# Altium PCB SemiPuente.PcbDoc
Units mm, origin at the board's own origin, x right, y up, seen from the top; angles counter-clockwise.
Board outline 100 x 99.9 mm, 2 copper layers (Top Layer, Bottom Layer); 18 components, 7 nets, 35 pads, 0 vias.
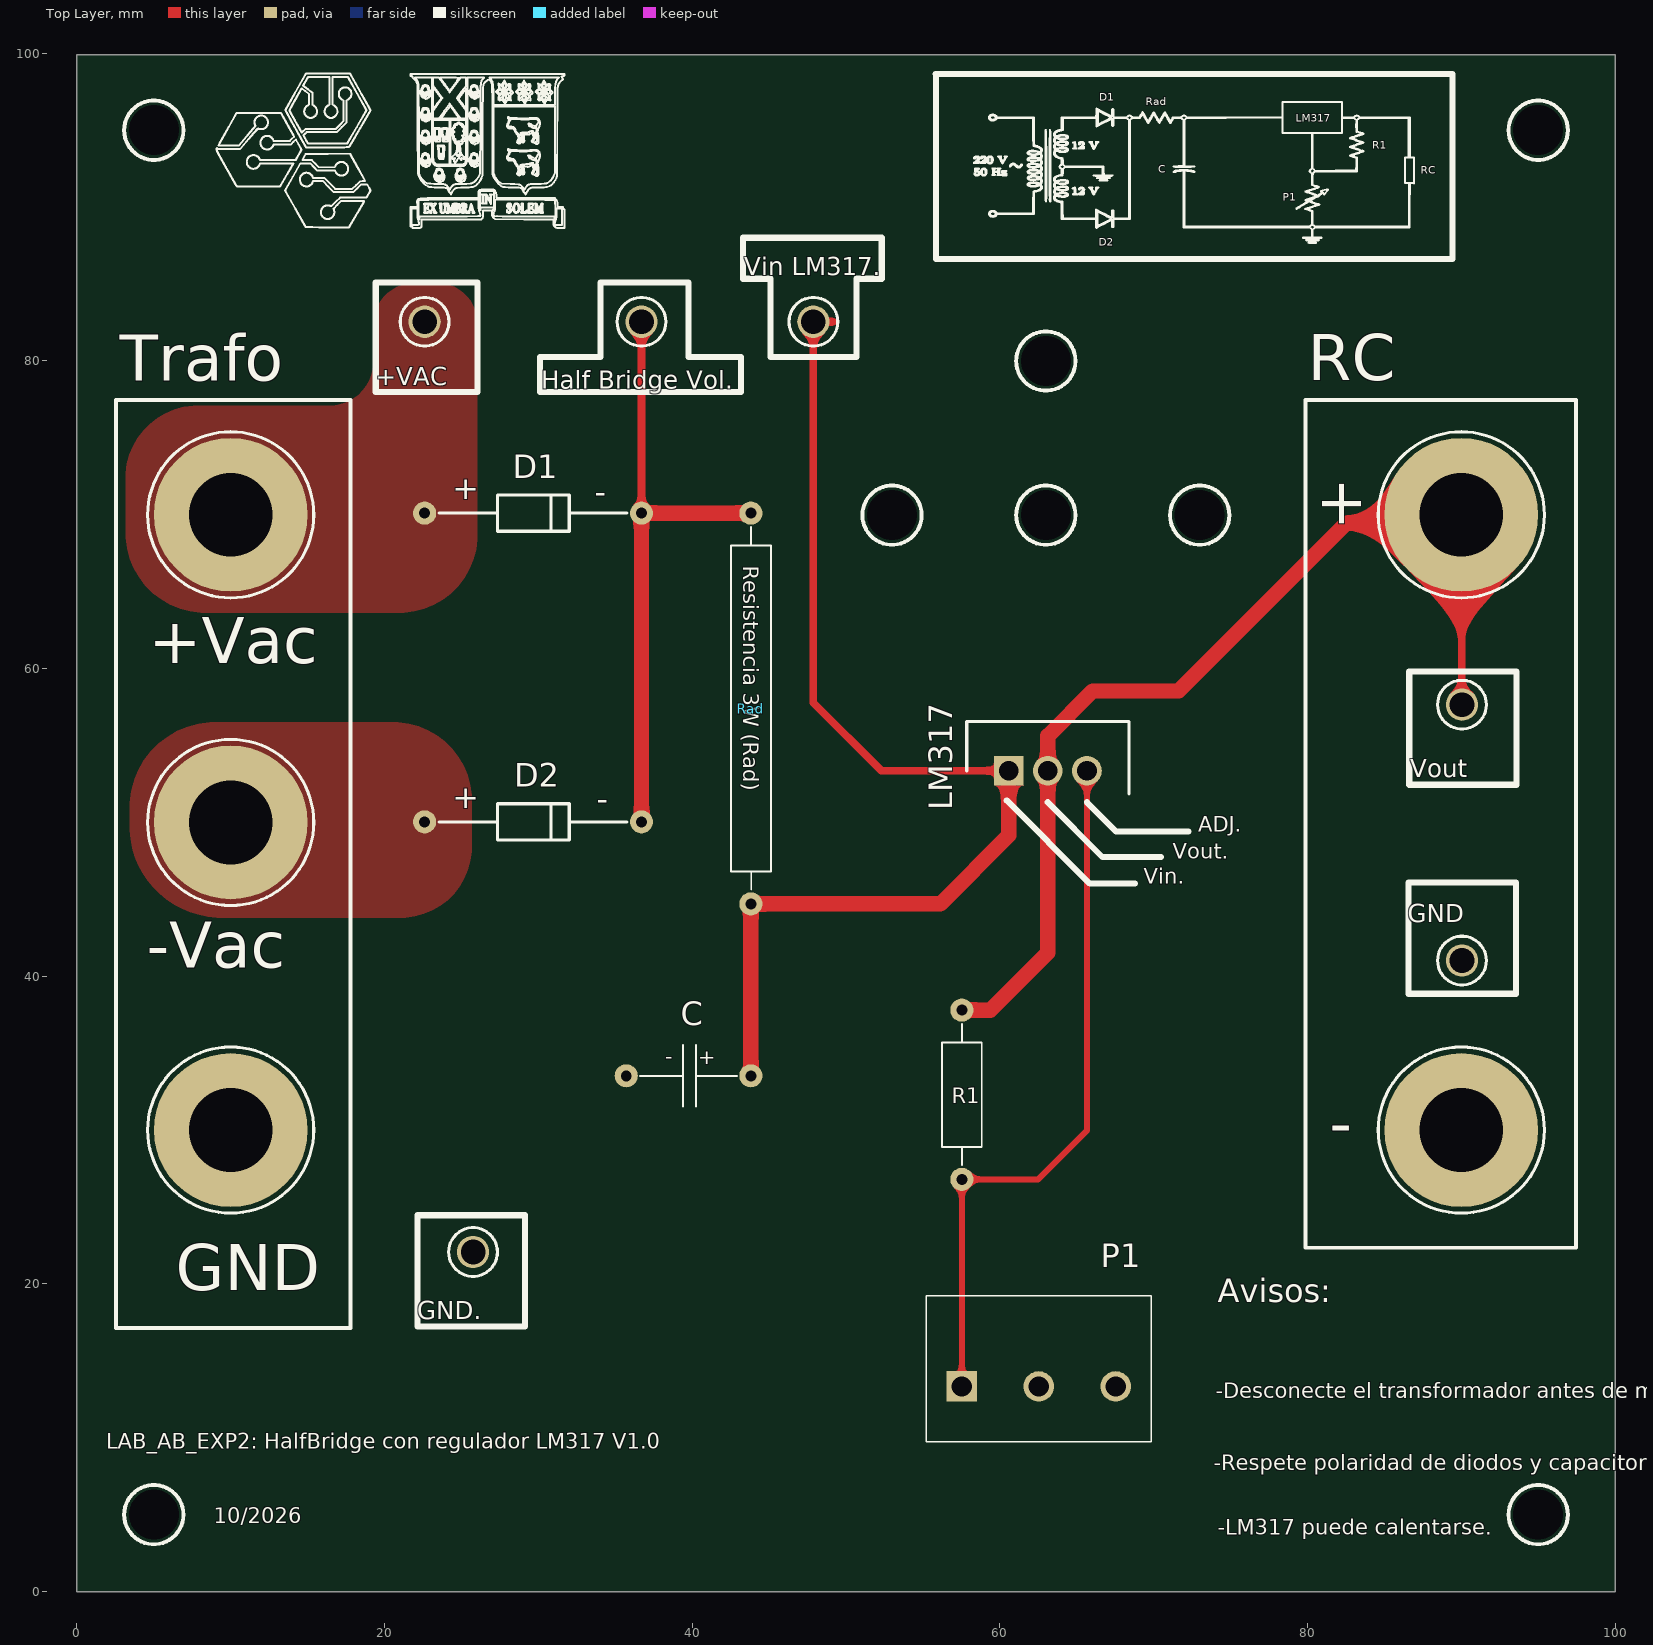
[diagram p0: Top Layer view]
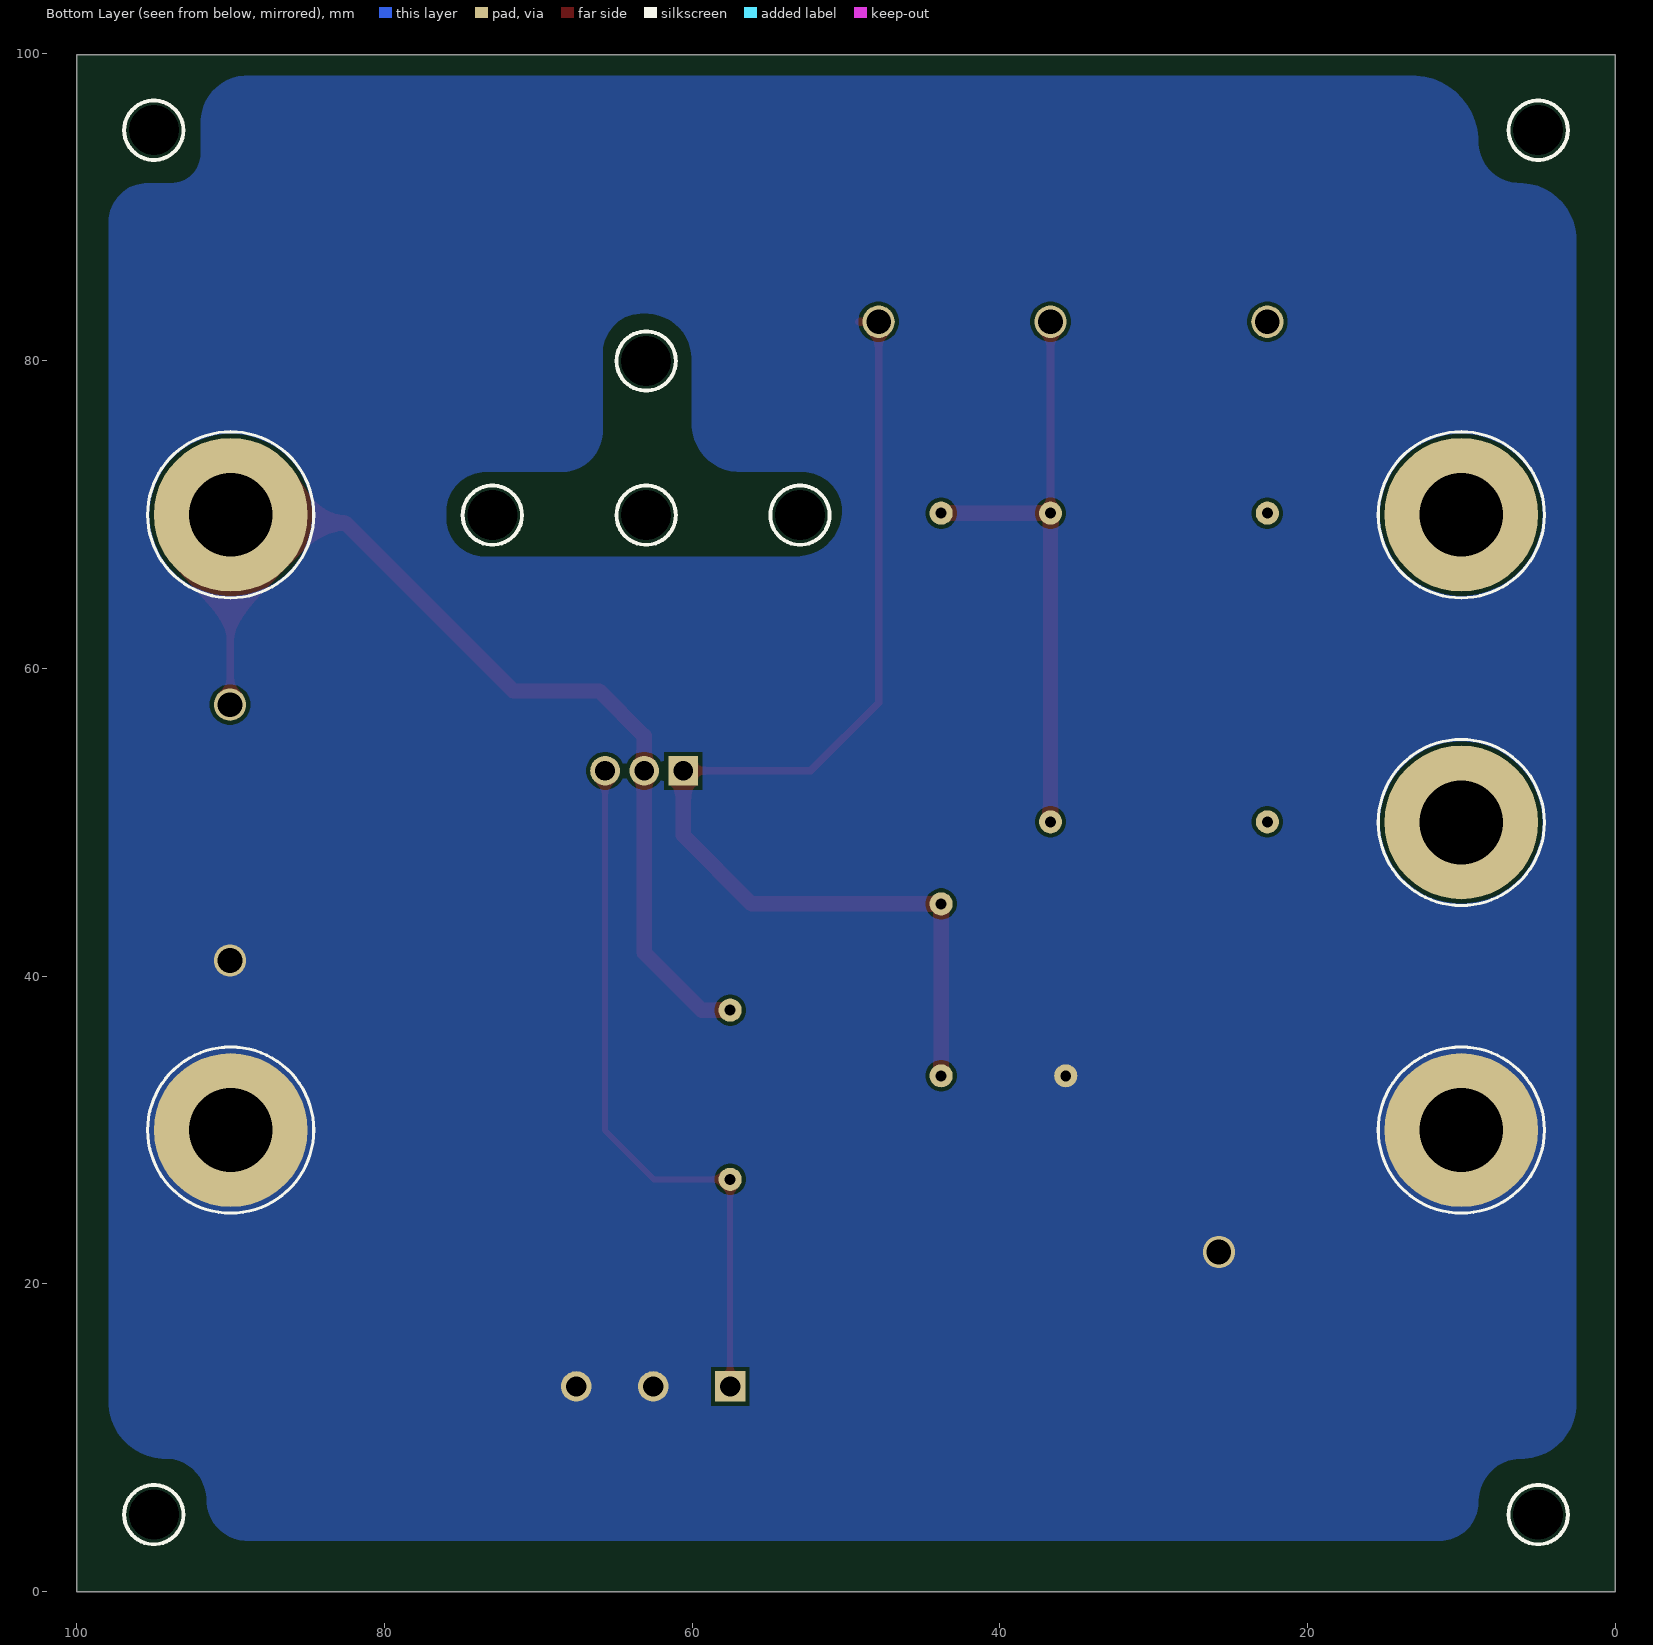
[diagram p1: Bottom Layer view, seen from below]

## Layer stack, top to bottom
Top Solder: solder mask 0.0102, Solder Resist, Dk 3.5
Top Layer: signal copper 0.0356
Dielectric 1: dielectric 0.32, FR-4, Dk 4.8
Bottom Layer: signal copper 0.0356
Bottom Solder: solder mask 0.0102, Solder Resist, Dk 3.5

## Board outline
0,0 0,99.898 100,99.898 100,0

## Design rules (kind name [scope] priority, off if disabled: settings)
Clearance [All] p1: gap=0.254 ignorepadtopadclearanceinfootprint=FALSE
HoleSize [All] p1: absolutevalues=TRUE maxlimit=6 minlimit=0.025 maxpercent=80.000 minpercent=20.000
PolygonConnect [All] p1: connectstyle=Direct reliefconductorwidth=0.254 reliefentries=4 polygonreliefangle="90 Angle" airgapwidth=0.254
RoutingVias [All] p1: holewidth=0.711 width=1.27 viastyle="Through Hole" minholewidth=0.711 minwidth=1.27 maxholewidth=0.711 maxwidth=1.27
SolderMaskExpansion [All] p1: expansion=0 istentingtop=FALSE
SupplyNets "Schematic Supply Nets_2" [InNet('+VAC')] p1: voltage=0.000
SupplyNets "Schematic Supply Nets_1" [InNet('GND')] p2: voltage=0.000
SupplyNets "Schematic Supply Nets" [InNet('-VAC')] p3: voltage=0.000
Width [All] p1: maxlimit=3 minlimit=0.254 preferedwidth=0.254
29 further rules are at their usual default settings.

## Components (designator, comment, footprint, x,y, rotation, side; value= is the part's Value field where it differs from the comment)
+ "575-4" KSTN-575-4 90,70 r0 top (schematic designator TP1)
+VAC "5012" KSTN-5012_V 22.606,82.55 r180 top (schematic designator TP10)
+Vac "575-4" KSTN-575-4 10,70 r0 top (schematic designator TP3)
- "575-4" KSTN-575-4 90,30 r0 top (schematic designator TP2)
-Vac "575-4" KSTN-575-4 10,50 r0 top (schematic designator TP4)
C "B41896C6337M000" Capacitor2200uF 43.815,33.528 r180 top (schematic designator C1)
D1 "1N4007" Diodo1N4007 36.706,70.104 r180 top
D2 "1N4007" Diodo1N4007 36.706,50.038 r180 top
GND "5011" KSTN-5011_V 90.043,41.021 r270 top (schematic designator TP7)
GND "575-4" KSTN-575-4 10,30 r0 top (schematic designator TP5)
GND. "5011" KSTN-5011_V 25.756,22.073 r180 top (schematic designator TP17)
"Half Bridge Vol." "5010" KSTN-5010_V 36.703,82.55 r180 top (schematic designator TP6)
LM317 "LM317AT_NOPB" TO254P470X1028X1955-3P 60.579,53.357 r0 top (schematic designator IC3)
P1 "Potenciometro" PDB181K220K104B 57.531,13.335 r270 top (schematic designator VR1)
R1 "Zocalo_Resistencia_1/4W" Resistencia 57.531,37.797 r270 top (schematic designator R2)
Rad "Zocalo_Resistencia_3W" Resistencia3W 43.815,70.104 r270 top (schematic designator R1)
"Vin LM317." "5013" KSTN-5013_V 47.879,82.55 r180 top (schematic designator TP9)
Vout "5014" KSTN-5014_V 90.043,57.658 r270 top (schematic designator TP8)

## Footprints (in the part's own frame and the unit in brackets; to place one, negate y for a bottom-side part, rotate by r counter-clockwise, add the part's x,y. Pads: shape width x height; smd on the part's side, far side on the other; paste and mask are expansions set on the pad)
Capacitor2200uF [mm]
  round 1.5 hole 0.711: 1(0,0) 2(8.1,0)
  silkscreen extent 0.89,-2 7.21,2, body extent -3.94,-8.03 12.06,7.97, height 32
Diodo1N4007 [mm]
  round 1.5 hole 0.711: 1(0,0) 2(14.1,0)
  silkscreen extent 0.95,-1.17 13.15,1.17, body extent -1.27,-1.34 15.37,1.34, height 7.7
KSTN-575-4 [mm] "Banana Jack, Non-Insulated, Dia 7.92mm"
  round 10 hole 5.45: 1(0,0)
  silkscreen extent -5.4,-5.4 5.4,5.4, body extent -3.98,-3.96 3.92,3.94, height 2.36
KSTN-5010_V [mm] "Test Point, Dia 3.17mm"
  round 2.1 hole 1.6: 1(0,0)
  silkscreen extent -1.59,-1.58 1.59,1.58, body extent -1.59,-1.59 1.59,1.59, height 8.13
KSTN-5011_V [mm] "Test Point, Dia 3.17mm"
  round 2.1 hole 1.6: 1(0,0)
  silkscreen extent -1.58,-1.59 1.58,1.59, body extent -1.59,-1.59 1.59,1.59, height 8.13
KSTN-5012_V [mm] "Test Point, Dia 3.17mm"
  round 2.1 hole 1.6: 1(0,0)
  silkscreen extent -1.59,-1.58 1.59,1.58, body extent -1.59,-1.59 1.59,1.59, height 8.13
KSTN-5013_V [mm] "Test Point, Dia 3.17mm"
  round 2.1 hole 1.6: 1(0,0)
  silkscreen extent -1.59,-1.58 1.59,1.58, body extent -1.59,-1.59 1.59,1.59, height 8.13
KSTN-5014_V [mm] "Test Point, Dia 3.17mm"
  round 2.1 hole 1.6: 1(0,0)
  silkscreen extent -1.58,-1.59 1.58,1.59, body extent -1.59,-1.59 1.59,1.59, height 8.13
PDB181K220K104B [mm]
  rect 1.98x1.98 hole 1.32: 1(0,0)
  round 1.98 hole 1.32: 2(0,5) 3(0,10)
  silkscreen extent -5.9,-2.3 3.6,12.3, body extent -5.58,-3.5 18.92,13.49, height 21.2
Resistencia [mm]
  round 1.5 hole 0.711: 1(0,0) 2(11,0)
  silkscreen extent 0.89,-1.3 10.08,1.3, body extent -1.27,-1.27 12.27,1.27, height 6.39
Resistencia3W [mm]
  round 1.5 hole 0.711: 1(0,0) 2(25.4,0)
  silkscreen extent 0.89,-1.3 24.48,1.3, body extent -1.27,-1.27 26.67,1.27, height 4.4
TO254P470X1028X1955-3P [mm]
  round 1.935 hole 1.29: 1(5.08,0) 2(2.54,0)
  rect 1.935x1.935 hole 1.29: 3(0,0)
  silkscreen extent -2.73,-1.5 7.81,3.2, body extent -3.43,-0.27 8.46,19.57, height 4.41

## Part data
+ +Vac - -Vac GND: library part CMP-2000-05649-1, "Banana Jack, Non-Insulated, 1-Pin THD, RoHS, Bulk", Color=-, Manufacturer=Keystone-Electronics, Package Description="1-Pin Through Hole Device, Dia 7.92 mm", Package Version="Rev. B, 11/1994", Body Material=-, Category=Connectors,Interconnects, Contact Finish=Nickel, Contact Material=Brass, Datasheet URL=http://www.keyelco.com/product-pdf.cfm?p=2379, Datasheet Version="Rev. B, 11/1994", Family=BananaandTipConnectors-Jacks,Plugs, Features=-, Gender=Female, Insulation=Non-Insulated, Manufacturer URL=http://www.keyelco.com/, Mounting Technology=ThroughHole, Mounting Type=ThroughHole, Operating Temperature=-, Package Reference=575-4, Package URL=http://www.keyelco.com/product-pdf.cfm?p=2379, Packaging=Bulk, Plug/Mating Plug Diameter=StandardBanana, Series=-, Termination=Solder, Type=BananaJack, Wire Gauge=-
+VAC: library part CMP-1672-00004-4, "Test Point, White, Through Hole, RoHS, Bulk", Colour=White, Manufacturer=Keystone, Package Quantity=100, ComponentLink1Description="Manufacturer URL", ComponentLink1URL=http://www.keyelco.com/, ComponentLink2Description=Datasheet, ComponentLink2URL=http://www.keyelco.com/product-pdf.cfm?p=1321, Contact Material=Bronze, Contact Plating=Silver, DatasheetVersion="Rev. F, 12/2013", Height="8.12 mm", Length="11.3 mm", Mount="Through Hole", Mounting Technology="Through Hole", PackageDescription="1-Pin Through Hole Device, Dia 3.17 mm", PackageReference=5012, Packaging=Bulk, Pins=1, REACH SVHC="No SVHC", RoHSCompliant=true
C: library part Zocalo_Cap2200uF, "Aluminum Electrolytic Capacitors - Radial Leaded 50VDC 330uF 20% STD Leads", Manufacturer_Name=TDK, Mouser Part Number=871-B41896C6337M000, Datasheet Link=https://product.tdk.com/system/files/dam/doc/product/capacitor/aluminum-electrolytic/single-ended/data_sheet/20/30/db/aec/b41896.pdf, Geometry.Height=22mm, Manufacturer_Part_Number=B41896C6337M000, Mouser Price/Stock=https://www.mouser.co.uk/ProductDetail/EPCOS-TDK/B41896C6337M000?qs=nadT%2FcWsIvCjUCa32zZtbg%3D%3D
D1 D2: library part Zocalo_1N4007, "Switching diode with a peak reverse voltage of 1 kV, a maximum forward current of 1 A, and a peak repetitive forward current of 5.4 A", Manufacturer_Name=Diotec, Mouser Part Number=637-1N4007, Datasheet Link=https://diotec.com/tl_files/diotec/files/pdf/datasheets/1n4001.pdf, Manufacturer_Part_Number=1N4007, Mouser Price/Stock=https://www.mouser.co.uk/ProductDetail/Diotec-Semiconductor/1N4007?qs=OlC7AqGiEDmK9mU1uTiCkg%3D%3D
GND GND.: library part CMP-1672-00003-4, "Test Point, Black, Through Hole, RoHS, Bulk", Colour=Black, Manufacturer=Keystone, Package Quantity=100, ComponentLink1Description="Manufacturer URL", ComponentLink1URL=http://www.keyelco.com/, ComponentLink2Description=Datasheet, ComponentLink2URL=http://www.keyelco.com/product-pdf.cfm?p=1320, Contact Material=Bronze, Contact Plating=Silver, DatasheetVersion="Rev. F, 12/2013", Height="8.12 mm", Mount="Through Hole", Mounting Technology="Through Hole", PackageDescription="1-Pin Through Hole Device, Dia 3.17 mm", PackageReference=5011, Packaging=Bulk, Pins=1, REACH SVHC="No SVHC", RoHSCompliant=true
"Half Bridge Vol.": library part CMP-1672-00002-4, "Test Point, Red, Through Hole, RoHS, Bulk", Colour=Red, Manufacturer=Keystone, Package Quantity=100, ComponentLink1Description="Manufacturer URL", ComponentLink1URL=http://www.keyelco.com/, ComponentLink2Description=Datasheet, ComponentLink2URL=http://www.keyelco.com/product-pdf.cfm?p=1319, Contact Material=Bronze, Contact Plating=Silver, DatasheetVersion="Rev. F, 12/2013", Height="8.12 mm", Mount="Through Hole", Mounting Technology="Through Hole", PackageDescription="1-Pin Through Hole Device, Dia 3.17 mm", PackageReference=5010, Packaging=Bulk, Pins=1, REACH SVHC="No SVHC", RoHSCompliant=true
LM317: "Integrated Circuit", Arrow Part Number=LM317AT/NOPB, Manufacturer_Name="Texas Instruments", Mouser Part Number=926-LM317AT/NOPB, Arrow Price/Stock=https://www.arrow.com/en/products/lm317atnopb/texas-instruments?utm_currency=USD&region=europe, Datasheet Link=http://www.ti.com/lit/gpn/lm317a, Height=4.7mm, Manufacturer_Part_Number=LM317AT/NOPB, Mouser Price/Stock=https://www.mouser.co.uk/ProductDetail/Texas-Instruments/LM317AT-NOPB?qs=X1J7HmVL2ZFYFJRcNgsWcQ%3D%3D
P1: "Variable Resistor", Arrow Part Number=PDB181-K420K-502B, Manufacturer_Name=Bourns, Mouser Part Number=652-PDB181-K420K502B, Arrow Price/Stock=https://www.arrow.com/en/products/pdb181-k420k-502b/bourns?region=nac, Datasheet Link=https://www.bourns.com/docs/product-datasheets/PDB18.pdf, Height=16.5mm, Manufacturer_Part_Number=PDB181-K420K-502B, Mouser Price/Stock=https://www.mouser.co.uk/ProductDetail/Bourns/PDB181-K420K-502B?qs=Ivs1Be2ZGq6EMYRq4LQhiA%3D%3D
R1 Rad: "1.07 kOhms Â±1% 0.25W, 1/4W Through Hole Resistor Axial - Metal Film", Package="RADIAL-2 YAGEO", Check_prices=https://www.snapeda.com/parts/MFR-25FBF52-1K/Yageo/view-part/?ref=eda, MF=Yageo, MP=MFR-25FBF52-1K, SnapEDA_Link=https://www.snapeda.com/parts/MFR-25FBF52-1K/Yageo/view-part/?ref=snap
"Vin LM317.": library part CMP-1672-00005-4, "Test Point, Orange, Through Hole, RoHS, Bulk", Colour=Orange, Manufacturer=Keystone, Package Quantity=100, ComponentLink1Description="Manufacturer URL", ComponentLink1URL=http://www.keyelco.com/, ComponentLink2Description=Datasheet, ComponentLink2URL=http://www.keyelco.com/product-pdf.cfm?p=1322, Contact Material=Bronze, Contact Plating=Silver, DatasheetVersion="Rev. F, 12/2013", Height="8.12 mm", Mount="Through Hole", Mounting Technology="Through Hole", PackageDescription="1-Pin Through Hole Device, Dia 3.17 mm", PackageReference=5013, Packaging=Bulk, REACH SVHC="No SVHC", RoHSCompliant=True
Vout: library part CMP-1672-00006-4, "Test Point, Yellow, Through Hole, RoHS, Bulk", Colour=Yellow, Manufacturer=Keystone, Package Quantity=100, ComponentLink1Description="Manufacturer URL", ComponentLink1URL=http://www.keyelco.com/, ComponentLink2Description=Datasheet, ComponentLink2URL=http://www.keyelco.com/product-pdf.cfm?p=1323, Contact Material=Bronze, Contact Plating=Silver, DatasheetVersion="Rev. F, 12/2013", Height="8.12 mm", Mount="Through Hole", Mounting Technology="Through Hole", PackageDescription="1-Pin Through Hole Device, Dia 3.17 mm", PackageReference=5014, Packaging=Bulk, REACH SVHC="No SVHC", RoHSCompliant=true

## Free pads (board coordinates)
  round 0 hole 3.25: 7(5,5) 7(5,95) 7(52.992,69.977) 7(62.992,69.977) 7(62.992,79.997) 7(72.992,69.977) 7(95,5) 7(95,95)

## Nets (pads, with @x,y where several pads share a name; then routed paths per layer and width w, separated by ;. In a path a pad name is that pad's centre, name@x,y a point inside that pad or via, vN(x,y) a via of type N, cw(c..) or ccw(c..) an arc to the next point about the centre after c; other vN are vias at no path point)
+VAC: +Vac.1 +VAC.1 D1.2
-VAC: -Vac.1 D2.2
ADJ_317: LM317.1 P1.1 R1.2 | length 46.3
  Top Layer w0.4: P1.1 R1.2 62.484,26.797 65.659,29.972 LM317.1
GND: -.1 C.2 GND.1 GND..1 P1.2 P1.3
HalfBridge: "Half Bridge Vol..1" D1.1 D2.1 Rad.1 | length 39.6
  Top Layer w0.5: D1.1@36.705,70.105 36.705,82.548
  Top Layer w1: 36.701,82.548 36.703,82.55 ; D1.1@36.705,70.105 D1.1 ; D2.1 D1.1 ; Rad.1 D1.1
IN_317: "Vin LM317..1" C.1 LM317.3 Rad.2 | length 74.6
  Top Layer w0.5: 49.149,82.55 47.879,82.55 47.879,57.785 52.307,53.357 LM317.3
  Top Layer w1: C.1 Rad.2 56.134,44.704 60.579,49.149 LM317.3
OUT_317: +.1 LM317.2 R1.1 Vout.1 | length 66.4
  Top Layer w0.5: Vout.1@90.021,57.68 +.1@90.021,69.979
  Top Layer w1: R1.1 59.387,37.797 63.119,41.529 LM317.2 63.119,55.626 66.04,58.547 71.628,58.547 82.55,69.469 89.469,69.469 +.1 +.1@90.021,69.979 ; Vout.1@90.021,57.68 Vout.1

## Polygon pours and split planes (outlines as drawn)
-VAC on Top Layer "-VAC_L01_P001" (solid, pour order 1): 3.429,56.388 3.429,49.784 ccw(c9.398,49.784) 9.398,43.815 21.082,43.815 ccw(c21.082,48.387) 25.654,48.387 25.654,51.435 ccw(c20.574,51.435) 20.574,56.515 9.017,56.515 ccw(c9.017,50.927) 3.429,50.927
+VAC on Top Layer "+VAC_L01_P000" (solid, pour order 0): 8.382,63.627 20.955,63.627 ccw(c20.955,68.707) 26.035,68.707 26.035,82.423 ccw(c23.368,82.423) 23.368,85.09 21.971,85.09 ccw(c21.971,82.423) 19.304,82.423 19.304,80.01 cw(c16.383,80.01) 16.383,77.089 7.874,77.089 ccw(c7.874,72.39) 3.175,72.39 3.175,68.834 ccw(c8.382,68.834)
GND on Bottom Layer "GND_L02_P002" (solid, pour order 2): 8.89,5.842 ccw(c11.43,5.842) 11.43,3.302 88.9,3.302 ccw(c88.9,5.969) 91.567,5.969 cw(c94.234,5.969) 94.234,8.636 ccw(c94.234,12.319) 97.917,12.319 97.917,89.027 ccw(c95.377,89.027) 95.377,91.567 93.853,91.567 cw(c93.853,93.472) 91.948,93.472 91.948,95.504 ccw(c88.9,95.504) 88.9,98.552 13.208,98.552 ccw(c13.208,94.234) 8.89,94.234 cw(c6.223,94.234) 6.223,91.567 ccw(c6.223,87.884) 2.54,87.884 2.54,12.192 ccw(c6.096,12.192) 6.096,8.636 cw(c6.096,5.842)

## Other copper
Bottom Layer:
  pour cut-out: 53.213,67.31 73.533,67.31 ccw(c73.533,69.723) 75.946,69.723 75.946,70.231 ccw(c73.406,70.231) 73.406,72.771 68.453,72.771 cw(c68.453,75.438) 65.786,75.438 65.786,80.645 ccw(c63.246,80.518) 63.119,83.058 ccw(c62.992,80.137) 60.071,80.264 60.071,75.946 cw(c56.896,75.946) 56.896,72.771 52.832,72.771 ccw(c52.832,70.231) 50.292,70.231 ccw(c53.213,70.231)

## Silkscreen, mask and mechanical layers (free items; w line width, h text height)
Top Overlay:
  drawing of 27084 lines, arcs and shapes, not listed
  text "D1" at 66.472,96.926 h0.5
  text "Rad" at 69.494,96.622 h0.5
  text "LM317" at 79.248,95.555 h0.5
  text "R1" at 84.201,93.802 h0.5
  text "C" at 70.307,92.227 h0.5
  text "RC" at 87.351,92.177 h0.5
  text "P1" at 78.384,90.424 h0.5
  text "D2" at 66.424,87.502 h0.5
  text "RC" at 80.01,78.74 h3
  text "Trafo" at 2.794,78.724 h3
  text "ADJ." at 72.898,49.403 h1
  text "Vout." at 71.247,47.625 h1
  text "Vin." at 69.367,45.999 h1
  text "Avisos:" at 74.168,18.796 h1.52
  text "-Desconecte el transformador antes de modificar el circuito." at 74.041,12.573 h1
  text "LAB_AB_EXP2: HalfBridge con regulador LM317 V1.0" at 1.905,9.271 h1
  text "-Respete polaridad de diodos y capacitor." at 73.914,7.874 h1
  text "10/2026" at 8.89,4.445 h1
  text "-LM317 puede calentarse." at 74.168,3.683 h1
Bottom Overlay:
  circle w0.254: c62.992,69.977 r1.927
  circle w0.254: c52.992,69.977 r1.927
  circle w0.254: c72.992,69.977 r1.927
  circle w0.254: c62.992,79.997 r1.927
  circle w0.254: c5,5 r1.927
  circle w0.254: c5,95 r1.927
  circle w0.254: c95,5 r1.927
  circle w0.254: c95,95 r1.927

## Text inside footprints (layer, text, board x,y; h text height)
C: Top Overlay "-" at 38.735,35.044 h1 r180; Top Overlay "+" at 41.529,35.092 h1 r180
D1: Top Overlay "+" at 26.162,72.263 h1.52 r180; Top Overlay "-" at 34.417,71.882 h1.52 r180
D2: Top Overlay "+" at 26.162,52.197 h1.52 r180; Top Overlay "-" at 34.544,51.943 h1.52 r180
Rad: Top Overlay "Resistencia 3W (Rad)" at 43.307,66.675 h1 r270